# Altium PCB daughter_board.PcbDoc
Units mil, origin at the board's own origin, x right, y up, seen from the top; angles counter-clockwise.
Board outline 685.04 x 1771.65 mil, 2 copper layers (Top Layer, Bottom Layer); 12 components, 7 nets, 48 pads, 11 vias.
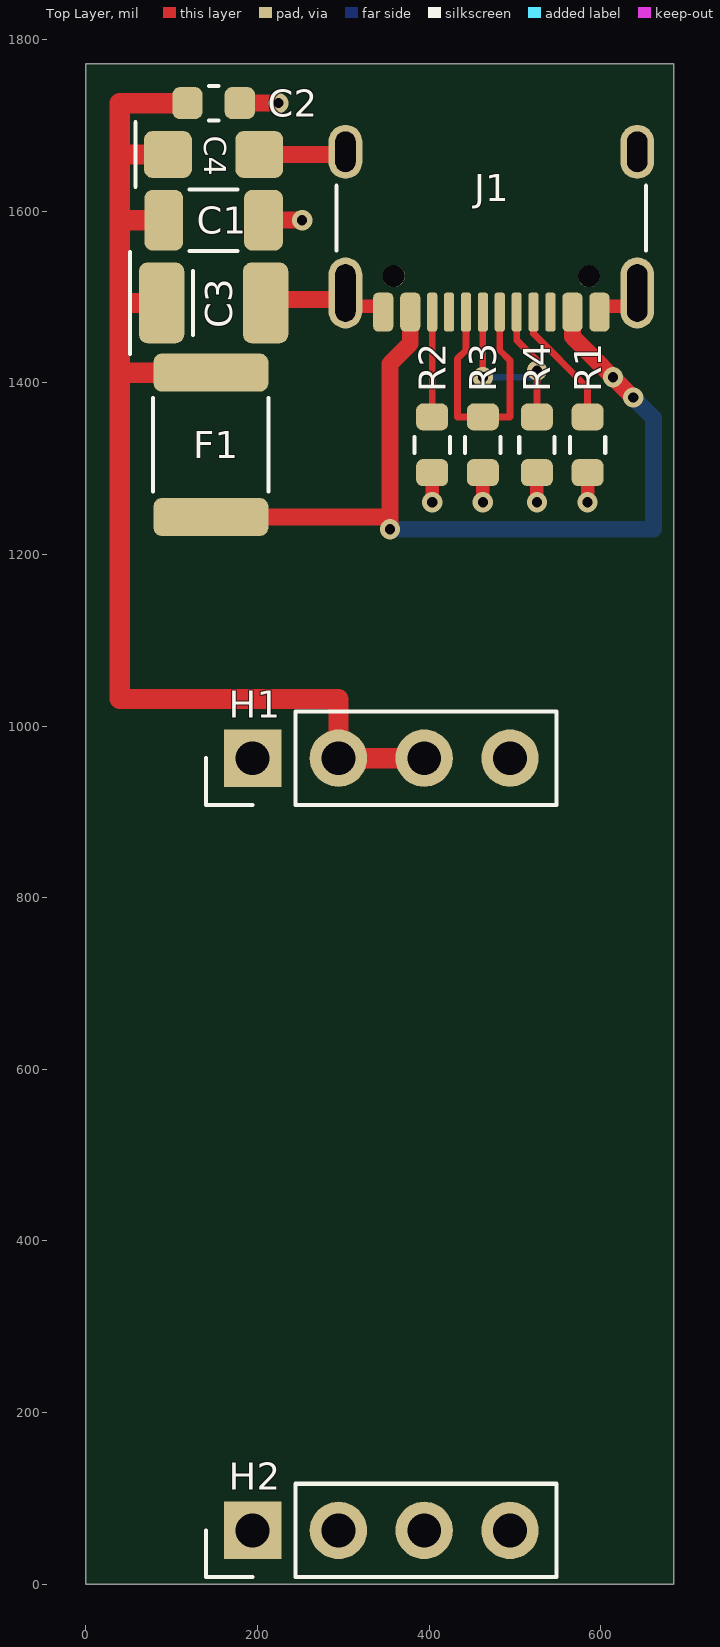
[diagram p0: Top Layer view]
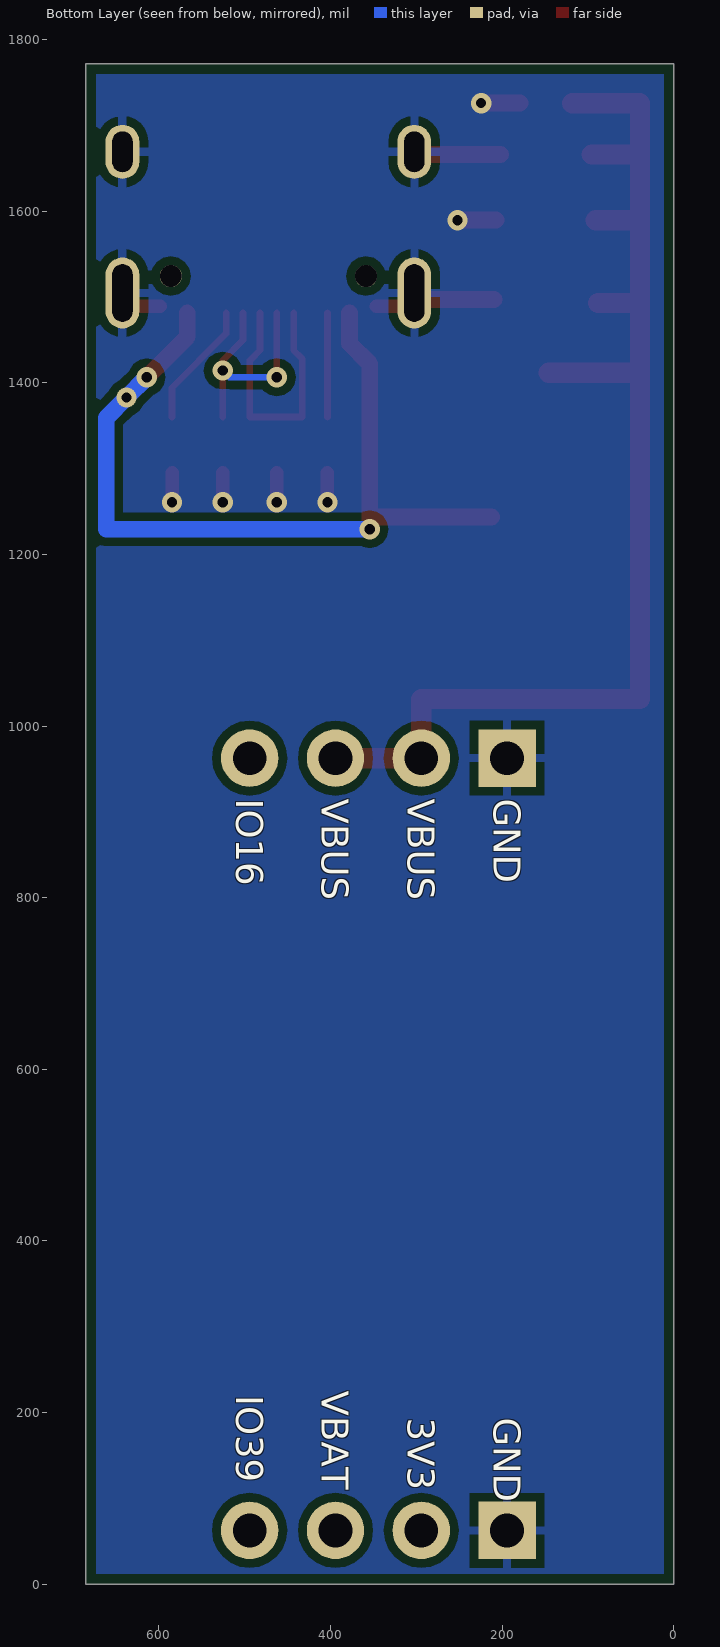
[diagram p1: Bottom Layer view, seen from below]
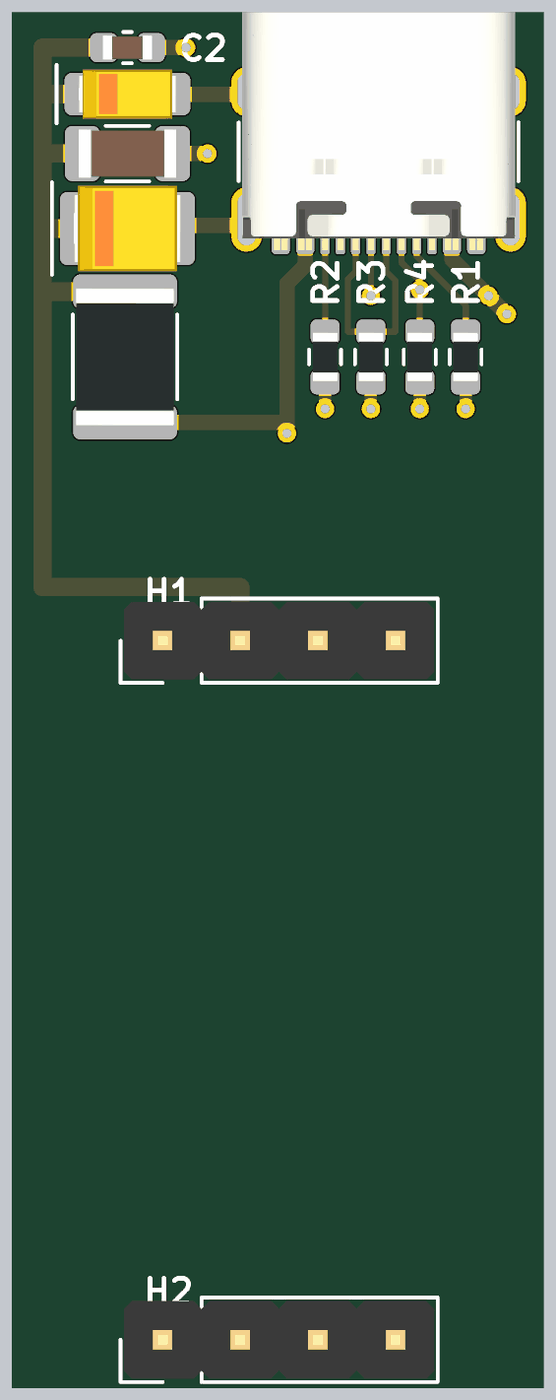
[diagram p2: 3D render of the assembled board from above, using the file's embedded part models]

## Layer stack, top to bottom
Top Solder: solder mask 0.4, Solder Resist, Dk 3.5
Top Layer: signal copper 1.4
Dielectric 1: dielectric 12.6, FR-4, Dk 4.8
Bottom Layer: signal copper 1.4
Bottom Solder: solder mask 0.4, Solder Resist, Dk 3.5

## Board outline
0,0 685.04,0 685.04,1771.65 0,1771.65

## Design rules (kind name [scope] priority, off if disabled: settings)
Clearance PolygonClearance [InPolygon] p1: gap=9.84 ignorepadtopadclearanceinfootprint=FALSE
Clearance [All] p2: gap=5.91 ignorepadtopadclearanceinfootprint=FALSE
MinimumSolderMaskSliver [All] p1: minsoldermaskwidth=3.15
PolygonConnect ViaDirect [IsVia] p1: connectstyle=Direct reliefconductorwidth=10 reliefentries=4 polygonreliefangle="90 Angle" airgapwidth=10
PolygonConnect [All] p2: connectstyle=Relief reliefconductorwidth=10 reliefentries=4 polygonreliefangle="90 Angle" airgapwidth=10
RoutingVias [All] p1: holewidth=11.81 width=23.62 viastyle="Through Hole" minholewidth=11.81 minwidth=23.62 maxholewidth=11.81 maxwidth=23.62
SilkToSilkClearance [All] p1: silktosilkclearance=5.91
SilkToSolderMaskClearance [IsPad] p1: minsilkscreentomaskgap=3.94 clearancetoexposedcopper=TRUE
SolderMaskExpansion TentVias [IsVia] p1: expansion=-13.78 istentingtop=FALSE
SolderMaskExpansion [All] p2: expansion=1.97 istentingtop=FALSE
Width [All] p1: maxlimit=39.37 minlimit=5.91 preferedwidth=9.84 minimp=50.000000 maximp=50.000000 favimp=50.000000
27 further rules are at their usual default settings.

## Components (designator, comment, footprint, x,y, rotation, side; value= is the part's Value field where it differs from the comment)
C1 "47uF 10V" C_1206_3216Metric 148.82,1589.57 r0 top
C2 "100nF" C_0603_1608Metric 148.82,1725.98 r0 top
C3 "10uF 16V" CP_EIA-3528-21_Kemet-B 148.82,1493.11 r0 top
C4 "1uF 25V" CP_EIA-3216-18_Kemet-A 148.82,1666.14 r0 top
F1 "MF-MSMF110-2" Fuse_1812_4532Metric 145.67,1327.76 r90 top
H1 "1x4 M 2.54" PinHeader_1x04_P2.54mm_Vertical 194.21,962.56 r90 top
H2 "1x4 M 2.54" PinHeader_1x04_P2.54mm_Vertical 194.21,62.56 r90 top
J1 "U262-161N-4BVC11" USB_C_Receptacle_XKB_U262-16XN-4BVC11 472.44,1626.97 r180 top
R1 "5.1k 1%" R_0603_1608Metric 584.65,1327.76 r270 top
R2 "5.1k 1%" R_0603_1608Metric 403.54,1327.76 r270 top
R3 "15k" R_0603_1608Metric 462.6,1327.76 r270 top
R4 "15k" R_0603_1608Metric 525.59,1327.76 r270 top

## Footprints (in the part's own frame and the unit in brackets; to place one, negate y for a bottom-side part, rotate by r counter-clockwise, add the part's x,y. Pads: shape width x height; smd on the part's side, far side on the other; paste and mask are expansions set on the pad)
C_0603_1608Metric [mm]
  rrect50% 0.9x0.95 smd: 1(-0.775,0) 2(0.775,0)
  silkscreen extent -0.14,-0.51 0.14,0.51, body extent -0.8,-0.4 0.8,0.4, height 0.8
C_1206_3216Metric [mm]
  rrect43% 1.15x1.8 smd: 1(-1.475,0) 2(1.475,0)
  silkscreen extent -0.71,-0.91 0.71,0.91, body extent -1.6,-0.8 1.6,0.8, height 1.6
CP_EIA-3216-18_Kemet-A [mm]
  rrect36% 1.415x1.39 smd: 1(-1.352,0) 2(1.352,0)
  silkscreen extent -2.32,-0.95 -2.32,0.95, body extent -1.6,-0.8 1.6,0.8, height 1.8
CP_EIA-3528-21_Kemet-B [mm]
  rrect37% 1.34x2.39 smd: 1(-1.54,0) 2(1.54,0)
  silkscreen extent -2.47,-1.51 -2.47,1.51, body extent -1.75,-1.4 1.75,1.4, height 2.1
Fuse_1812_4532Metric [mm]
  rrect44% 1.125x3.4 smd: 1(-2.137,0) 2(2.137,0)
  silkscreen extent -1.39,-1.71 1.39,1.71, body extent -2.25,-1.6 2.25,1.6, height 0.6
PinHeader_1x04_P2.54mm_Vertical [mm]
  rect 1.7x1.7 hole 1: 1(0,0)
  round 1.7 hole 1: 2(0,-2.54) 3(0,-5.08) 4(0,-7.62)
  silkscreen extent -1.38,-9 1.38,1.38, body extent -1.27,-8.89 1.27,1.27, height 8.54
R_0603_1608Metric [mm]
  rrect50% 0.8x0.95 smd: 1(-0.825,0) 2(0.825,0)
  silkscreen extent -0.24,-0.52 0.24,0.52, body extent -0.8,-0.4 0.8,0.4, height 0.45
USB_C_Receptacle_XKB_U262-16XN-4BVC11 [mm]
  rrect50% 0.6x1.15 smd: A1(-3.2,3.67) A4(-2.4,3.67) A9(2.4,3.67) A12(3.2,3.67) B1(3.2,3.67) B4(2.4,3.67) B9(-2.4,3.67) B12(-3.2,3.67)
  rrect50% 0.3x1.15 smd: A5(-1.25,3.67) A6(-0.25,3.67) A7(0.25,3.67) A8(1.25,3.67) B5(1.75,3.67) B6(0.75,3.67) B7(-0.75,3.67) B8(-1.75,3.67)
  oval 1x2.1 hole 0.6 slot 1.7 at 90 deg: SH(-4.32,3.105) SH(4.32,3.105)
  oval 1x1.6 hole 0.6 slot 1.2 at 90 deg: SH(-4.32,-1.075) SH(4.32,-1.075)
  round 0.65 hole 0.65 unplated: ""(-2.89,2.605) ""(2.89,2.605)
  silkscreen extent -4.58,-0.07 4.58,1.85, body extent -4.47,-3.67 4.47,4.11, height 3.31

## Part data
C1 C2: library part CAP
C3 C4: library part CAP_POL
F1: library part PTC_FUSE
H1: library part LILYGO_L11-14
H2: library part LILYGO_R11-14
J1: library part USB_C_16P
R1 R2 R3 R4: library part RES

## Via types
v1: diameter 23.62, hole 11.81, Top Layer to Bottom Layer, 11 vias

## Nets (pads, with @x,y where several pads share a name; then routed paths per layer and width w, separated by ;. In a path a pad name is that pad's centre, name@x,y a point inside that pad or via, vN(x,y) a via of type N, cw(c..) or ccw(c..) an arc to the next point about the centre after c; other vN are vias at no path point)
+5V: C1.1 C2.1 C3.1 C4.1 F1.2 H1.2 H1.3 | length 1459.9
  Top Layer w23.62: 39.37,1493.11 C3.1 ; 39.37,1589.57 C1.1 ; 39.37,1666.14 C4.1 ; C2.1 39.37,1725.98 39.37,1411.89 ; F1.2 39.37,1411.89 ; H1.3 H1.2 294.21,1031.5 39.37,1031.5 39.37,1411.89
CC1: J1.A5 R1.1 | length 147.2
  Top Layer w7.87: J1.A5@521.65,1481.3 521.65,1457.28 584.65,1394.29 R1.1
CC2: J1.B5 R2.1 | length 121.1
  Top Layer w7.87: R2.1 J1.B5@403.54,1481.3
GND: C1.2 C2.2 C3.2 C4.2 H1.1 H2.1 J1.A1 J1.A12 J1.B1 J1.B12 J1.SH R1.2 R2.2 R3.2 R4.2 | length 509.4
  Top Layer w15.75: J1.SH@302.36,1489.17 J1.B1@346.46,1489.17 ; v1(403.54,1260.83) R2.2 ; v1(462.6,1260.83) R3.2 ; v1(525.59,1260.83) R4.2 ; v1(584.65,1260.83) R1.2 ; J1.B12@598.43,1489.17 J1.SH@642.52,1489.17
  Top Layer w19.68: C2.2 v1(224.41,1725.98) ; C4.2@202.05,1666.14 J1.SH@302.36,1666.14 ; C1.2 v1(251.97,1589.57) ; C3.2@209.45,1497.05 J1.SH@302.36,1497.05
USB_DN: J1.A7 J1.B7 R4.1 | length 271.9
  Top Layer w7.87: v1(462.6,1406.5) J1.A7@462.6,1481.3 ; J1.B7@501.97,1481.3 501.97,1449.8 525.59,1426.18 R4.1
  Bottom Layer w7.87: v1(462.6,1406.5) 517.72,1406.5 v1(525.59,1414.37)
USB_DP: J1.A6 J1.B6 R3.1 | length 312.1
  Top Layer w7.87: J1.B6@442.91,1481.3 442.91,1437.99 433.07,1428.15 433.07,1360.24 R3.1 494.09,1360.24 494.09,1426.18 482.28,1437.99 J1.A6@482.28,1481.3
VBUS_IN: F1.1 J1.A4 J1.A9 J1.B4 J1.B9 | length 1035.1
  Top Layer w19.68: F1.1@212.6,1243.62 354.33,1243.62 ; v1(354.33,1229.33) 354.33,1243.62 ; J1.B4@377.95,1481.3 377.95,1445.87 354.33,1422.24 354.33,1243.62 ; J1.B9@566.93,1481.3 566.93,1453.74 v1(637.8,1382.87)
  Bottom Layer w19.68: v1(354.33,1229.33) 661.42,1229.33 661.42,1359.25 v1(637.8,1382.87) v1(614.17,1406.5)
pads on no net: H1.4 H2.2 H2.3 H2.4 J1. J1.A8 J1.B8

## Polygon pours and split planes (outlines as drawn)
GND on Bottom Layer "GND_Bottom" (solid, remove dead copper, pour order 0): 11.81,11.81 673.23,11.81 673.23,1759.84 11.81,1759.84

## Silkscreen, mask and mechanical layers (free items; w line width, h text height)
Top Overlay:
  lines w4.72: 124.8,1455.71 124.8,1530.51
Bottom Overlay:
  text "GND" at 209.96,915.35 h31.5 r90
  text "VBUS" at 309.96,915.35 h31.5 r90
  text "VBUS" at 409.96,915.35 h31.5 r90
  text "IO16" at 509.96,915.35 h31.5 r90
  text "VBAT" at 409.96,225.28 h31.5 r90
  text "IO39" at 509.96,220.04 h31.5 r90
  text "GND" at 209.96,193.82 h31.5 r90
  text "3V3" at 309.96,193.82 h31.5 r90
Mechanical 1:
  the board outline again, w3.94